# Altium PCB SensWear-V1R1-MainBoard.PcbDoc (part 2 of 3)
Units mm, origin at the board's own origin, x right, y up, seen from the top; angles counter-clockwise.
Board outline 52.5 x 8.5 mm, 4 copper layers (Top Layer, Layer 1, Layer 2, Bottom Layer), stack 0.148 mm thick; 77 components, 63 nets, 291 pads, 132 vias.
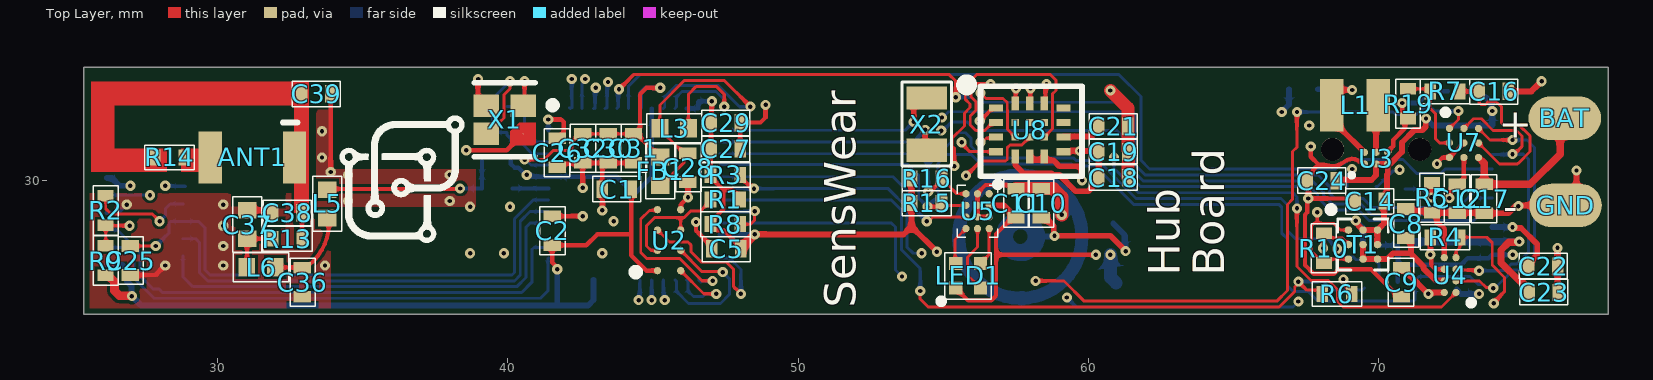
[diagram p0: Top Layer view]

## Part data (continued)
R2 R15 R16: library part ERJ-2RKF1501X, "RES SMD 1.5K OHM 1% 1/10W 0402", Manufacturer="Panasonic Electronic Components", Operating Temperature="-55°C ~ 155°C", Package / Case="0402 (1005 Metric)", Power (Watts)="0.1W, 1/10W", Resistance (Ohms)=1.5k, Supplier Device Package=0402, Supplier Part Number 1=P1.50KLDKR-ND, Temperature Coefficient=±100ppm/°C, Tolerance=±1%, Category=Resistors, ComponentLink1Description=https://industrial.panasonic.com/cdbs/www-data/pdf/RDA0000/AOA0000C283.pdf, ComponentLink1URL=https://industrial.panasonic.com/cdbs/www-data/pdf/RDA0000/AOA0000C283.pdf, Composition="Thick Film", Failure Rate=-, Features="Automotive AEC-Q200", Height - Seated (Max)="0.016\" (0.40mm)", Manufacturer Part Number=ERJ-2RKF1501X, Number of Terminations=2, Packaging=Digi-Reel®, Part Status=Active, Pricing 1="1=0.1, 10=0.025, 25=0.018, 50=0.0136, 100=0.01, 250=0.00764, 500=0.00612, 1000=0.00451, 5000=0.00323 (USD)", RoHS="RoHS Compliant", Size / Dimension="0.039\" L x 0.020\" W (1.00mm x 0.50mm)", Stock 1=1349197, Supplier 1=Digi-Key
R4: library part ERJ-2RKF1003X, "RES SMD 100K OHM 1% 1/10W 0402", Manufacturer="Panasonic Electronic Components", Operating Temperature="-55°C ~ 155°C", Package / Case="0402 (1005 Metric)", Power (Watts)="0.1W, 1/10W", Resistance (Ohms)=100k, Supplier Device Package=0402, Supplier Part Number 1=P100KLDKR-ND, Temperature Coefficient=±100ppm/°C, Tolerance=±1%, Category=Resistors, ComponentLink1Description=https://industrial.panasonic.com/cdbs/www-data/pdf/RDA0000/AOA0000C283.pdf, ComponentLink1URL=https://industrial.panasonic.com/cdbs/www-data/pdf/RDA0000/AOA0000C283.pdf, Composition="Thick Film", Failure Rate=-, Features="Automotive AEC-Q200", Height - Seated (Max)="0.016\" (0.40mm)", Manufacturer Part Number=ERJ-2RKF1003X, Number of Terminations=2, Packaging=Digi-Reel®, Part Status=Active, Pricing 1="1=0.1, 10=0.025, 25=0.018, 50=0.0136, 100=0.01, 250=0.00764, 500=0.00612, 1000=0.00451, 5000=0.00323 (USD)", RoHS="RoHS Compliant", Size / Dimension="0.039\" L x 0.020\" W (1.00mm x 0.50mm)", Stock 1=5976308, Supplier 1=Digi-Key
R5: library part ERJ2RKF2202X, "Res Thick Film 0402 22K Ohm 1% 0.1W(1/10W) ±100ppm/C Pad SMD Automotive T/R", Case Code (Imperial)=0402, Case Code (Metric)=1005, Manufacturer=Panasonic, Manufacturer Lifecycle Status=ACTIVE, Max Operating Temperature=155°C, Max Power Dissipation=100mW, Min Operating Temperature=-55°C, Ratings=AEC-Q200, Temperature Coefficient=100ppm/°C, Tolerance=1%, Voltage Rating=50V, Case/Package=0402, Category="Chip SMD Resistors", China RoHS=Non-Compliant, ComponentLink1Description=https://sigma.octopart.com:443/138766958/technical_drawing/Panasonic-ERJ-2RKF2202X.pdf?src-supplier=Upverter, ComponentLink1URL=https://sigma.octopart.com:443/138766958/technical_drawing/Panasonic-ERJ-2RKF2202X.pdf?src-supplier=Upverter, ComponentLink2Description=https://datasheet.octopart.com:443/ERJ2RKF2202X-Panasonic-datasheet-82288794.pdf?src-supplier=Upverter, ComponentLink2URL=https://datasheet.octopart.com:443/ERJ2RKF2202X-Panasonic-datasheet-82288794.pdf?src-supplier=Upverter, ComponentLink3Description=https://datasheet.octopart.com:443/ERJ2RKF2202X-Panasonic-datasheet-13266541.pdf?src-supplier=RS+(Formerly+Allied+Electronics), ComponentLink3URL=https://datasheet.octopart.com:443/ERJ2RKF2202X-Panasonic-datasheet-13266541.pdf?src-supplier=RS+(Formerly+Allied+Electronics), ComponentLink4Description=https://datasheet.octopart.com:443/ERJ2RKF2202X-Panasonic-datasheet-10025800.pdf?src-supplier=Future+Electronics, ComponentLink4URL=https://datasheet.octopart.com:443/ERJ2RKF2202X-Panasonic-datasheet-10025800.pdf?src-supplier=Future+Electronics, ComponentLink5Description=https://datasheet.octopart.com:443/ERJ2RKF2202X-Panasonic-datasheet-8853621.pdf?src-supplier=Future+Electronics, ComponentLink5URL=https://datasheet.octopart.com:443/ERJ2RKF2202X-Panasonic-datasheet-8853621.pdf?src-supplier=Future+Electronics, ComponentLink6Description=https://datasheet.octopart.com:443/ERJ2RKF2202X-Panasonic-datasheet-5313456.pdf?src-supplier=Future+Electronics, ComponentLink6URL=https://datasheet.octopart.com:443/ERJ2RKF2202X-Panasonic-datasheet-5313456.pdf?src-supplier=Future+Electronics, ComponentLink7Description=https://datasheet.octopart.com:443/ERJ2RKF2202X-Panasonic-datasheet-48891056.pdf?src-supplier=Newark, ComponentLink7URL=https://datasheet.octopart.com:443/ERJ2RKF2202X-Panasonic-datasheet-48891056.pdf?src-supplier=Newark, ComponentLink8Description=https://datasheet.octopart.com:443/ERJ2RKF2202X-Panasonic-datasheet-136608610.pdf?src-supplier=Newark, ComponentLink8URL=https://datasheet.octopart.com:443/ERJ2RKF2202X-Panasonic-datasheet-136608610.pdf?src-supplier=Newark, ComponentLink9Description=https://datasheet.octopart.com:443/ERJ-2RKF2202X-Panasonic-datasheet-154766169.pdf?src-supplier=Master+Electronics, ComponentLink9URL=https://datasheet.octopart.com:443/ERJ-2RKF2202X-Panasonic-datasheet-154766169.pdf?src-supplier=Master+Electronics, ComponentLink10Description=https://datasheet.octopart.com:443/ERJ2RKF2202X-Panasonic-datasheet-188592431.pdf?src-supplier=TME, ComponentLink10URL=https://datasheet.octopart.com:443/ERJ2RKF2202X-Panasonic-datasheet-188592431.pdf?src-supplier=TME, ComponentLink11Description=https://datasheet.octopart.com:443/ERJ2RKF2202X-Panasonic-datasheet-164353789.pdf?src-supplier=TME, ComponentLink11URL=https://datasheet.octopart.com:443/ERJ2RKF2202X-Panasonic-datasheet-164353789.pdf?src-supplier=TME, ComponentLink12Description=https://datasheet.octopart.com/ERJ2RKF2202X-Panasonic-datasheet-78375410.pdf, ComponentLink12URL=https://datasheet.octopart.com/ERJ2RKF2202X-Panasonic-datasheet-78375410.pdf, ComponentLink13Description=https://datasheet.octopart.com/Precision-Thick-Film-Chip-Resistors-Panasonic-datasheet-family-106.pdf, ComponentLink13URL=https://datasheet.octopart.com/Precision-Thick-Film-Chip-Resistors-Panasonic-datasheet-family-106.pdf, ComponentLink14Description=https://datasheet.octopart.com:443/ERJ2RKF2202X-Panasonic---ECG-datasheet-15994758.pdf?src-supplier=Farnell, ComponentLink14URL=https://datasheet.octopart.com:443/ERJ2RKF2202X-Panasonic---ECG-datasheet-15994758.pdf?src-supplier=Farnell, ComponentLink15Description=https://datasheet.octopart.com:443/ERJ2RKF2202X-Panasonic-datasheet-11542829.pdf?src-supplier=Arrow+Electronics, ComponentLink15URL=https://datasheet.octopart.com:443/ERJ2RKF2202X-Panasonic-datasheet-11542829.pdf?src-supplier=Arrow+Electronics, ComponentLink16Description=https://datasheet.octopart.com:443/ERJ-2RKF2202X-Panasonic-datasheet-41391857.pdf?src-supplier=Electro+Sonic, ComponentLink16URL=https://datasheet.octopart.com:443/ERJ-2RKF2202X-Panasonic-datasheet-41391857.pdf?src-supplier=Electro+Sonic, Composition="Thick Film", Contact Plating=Tin, Country of Origin="Japan, Mainland China", Depth=500µm, Export Control Classification Number (ECCN) Code=EAR99, Harmonized Tariff Schedule (HTS) Code=8533.21.00.30, Height=350µm, Introduction Date=2002-02-12, Lead Free="Lead Free", Length=1mm, Lifecycle Status=Production, Manufacturer Part Number=ERJ2RKF2202X, Military Standard=Not, Mounting Technology="Surface Mount", Number of Terminals=2, Number of Terminations=2, Packaging="Cut Tape", Part Series="Precision Thick Film Chip Resistors", Pins=2, Power Rating=100mW, Pricing="10000=0.0071, 30000=0.0069, 100000=0.0067, 200000=0.0066, 400000=0.0064 (USD)", Radiation Hardening=No, REACH SVHC=Yes, RoHS=Compliant, Schedule B="8533210045, 8533210045|8533210045, 8533210045|8533210045|8533210045, 8533210045|8533210045|8533210045|8533210045", Stock=20000, Supplier="Future Electronics", Supplier Part Number=ERJ2RKF2202X, Termination=SMD/SMT, Voltage Rating (DC)=50V, Width=500µm, Working Voltage=50V
R13 R14: library part ERJ-2GE0R00X, "RES SMD 0.0OHM JUMPER 1/10W 0402", Manufacturer="Panasonic Electronic Components", Operating Temperature="-55°C ~ 155°C", Package / Case="0402 (1005 Metric)", Power (Watts)="0.1W, 1/10W", Resistance (Ohms)=0.0, Supplier Device Package=0402, Supplier Part Number 1=P0.0JDKR-ND, Temperature Coefficient=-, Tolerance=Jumper, Category=Resistors, ComponentLink1Description=http://industrial.panasonic.com/www-cgi/jvcr13pz.cgi?E+PZ+3+AOA0001+ERJ2GE0R00X+7+WW, ComponentLink1URL=http://industrial.panasonic.com/www-cgi/jvcr13pz.cgi?E+PZ+3+AOA0001+ERJ2GE0R00X+7+WW, Composition="Thick Film", Features="Automotive AEC-Q200", Height="0.016\" (0.40mm)", Manufacturer Part Number=ERJ-2GE0R00X, Number of Terminations=2, Packaging=Digi-Reel®, Part Status=Active, Pricing 1="1=0.07, 50=0.0104, 100=0.0078, 250=0.00584, 500=0.0043, 1000=0.00287, 5000=0.00202 (GBP)", RoHS="RoHS Compliant", Size / Dimension="0.039\" L x 0.020\" W (1.00mm x 0.50mm)", Stock 1=6022701, Supplier 1=Digi-Key
R19: library part ERJ-2RKF1002X, "RES SMD 10K OHM 1% 1/10W 0402", Manufacturer="Panasonic Electronic Components", Operating Temperature="-55°C ~ 155°C", Package / Case="0402 (1005 Metric)", Power (Watts)="0.1W, 1/10W", Resistance (Ohms)=10k, Supplier Device Package=0402, Supplier Part Number 1=P10.0KLDKR-ND, Temperature Coefficient=±100ppm/°C, Tolerance=±1%, Category=Resistors, ComponentLink1Description=https://industrial.panasonic.com/cdbs/www-data/pdf/RDA0000/AOA0000C283.pdf, ComponentLink1URL=https://industrial.panasonic.com/cdbs/www-data/pdf/RDA0000/AOA0000C283.pdf, Composition="Thick Film", Failure Rate=-, Features="Automotive AEC-Q200", Height - Seated (Max)="0.016\" (0.40mm)", Manufacturer Part Number=ERJ-2RKF1002X, Number of Terminations=2, Packaging=Digi-Reel®, Part Status=Active, Pricing 1="1=0.1, 10=0.025, 25=0.018, 50=0.0136, 100=0.01, 250=0.00764, 500=0.00612, 1000=0.00451, 5000=0.00323 (USD)", RoHS="RoHS Compliant", Size / Dimension="0.039\" L x 0.020\" W (1.00mm x 0.50mm)", Stock 1=8105773, Supplier 1=Digi-Key
SW1: "Slide Switch, SPDT, Latched, 0.01A, 5VDC, Solder Terminal, Surface Mount-right Angle", Case/Package=SMD/SMT, Contact Current Rating=10mA, Contact Resistance=500mΩ, Insulation Resistance=100MΩ, Manufacturer=ALPS, Max Operating Temperature=60°C, Max Voltage Rating (DC)=5V, Min Operating Temperature=-10°C, Operating Force=1.5N, Supplier Part Number=4809-SSAJ110100DKR-ND, Actuator Length=1.2954mm, Category=Switches, ComponentLink1Description=https://datasheet.octopart.com:443/SSAJ110100-ALPS-datasheet-182235015.pdf?src-supplier=IHS, ComponentLink1URL=https://datasheet.octopart.com:443/SSAJ110100-ALPS-datasheet-182235015.pdf?src-supplier=IHS, ComponentLink2Description=https://datasheet.octopart.com:443/SSAJ110100-ALPS-datasheet-182235575.pdf?src-supplier=IHS, ComponentLink2URL=https://datasheet.octopart.com:443/SSAJ110100-ALPS-datasheet-182235575.pdf?src-supplier=IHS, ComponentLink3Description=https://datasheet.octopart.com:443/SSAJ110100-ALPS-datasheet-140497758.pdf?src-supplier=TME, ComponentLink3URL=https://datasheet.octopart.com:443/SSAJ110100-ALPS-datasheet-140497758.pdf?src-supplier=TME, Electrical Life=10kcycles, Export Control Classification Number (ECCN) Code=EAR99, Harmonized Tariff Schedule (HTS) Code=8536.50.70.00, Height=700µm, Illumination Type=Non-Illuminated, Introduction Date=2013-10-09, Length=5.5mm, Lifecycle Status=Production, Manufacturer Part Number=SSAJ110100, Max Current Rating=10mA, Mechanical Life=100kcycles, Mounting Technology="Surface Mount", Number of Positions=2, Packaging="Tape and Reel", Pricing="1=1.91, 10=1.613, 25=1.4968, 100=1.3334, 250=1.23648, 500=1.17008, 1000=1.10989, 2500=1.071 (USD)", Radiation Hardening=No, RoHS=Compliant, Stock=6215, Supplier=DigiKey, Supplier 1=DigiKey, Supplier Part Number 1=4809-SSAJ110100DKR-ND, Termination=Solder, Throw Configuration=SPDT, Voltage Rating (DC)=5V
T1: "MOSFET 2P-CH 3.9A 9DSBGA", Current - Continuous Drain (Id) @ 25°C=3.9A, Drain to Source Voltage (Vdss)=-, Input Capacitance (Ciss) (Max) @ Vds="595pF @ 10V", Manufacturer="Texas Instruments", Operating Temperature="-55°C ~ 150°C (TJ)", Package / Case="9-UFBGA, DSBGA", Power - Max=700mW, Supplier Device Package=9-DSBGA, .CheckedFootprint=Yes, .CheckedSchematic=Yes, Category="Discrete Semiconductor Products", ComponentLink1Description=http://www.ti.com/lit/ds/symlink/csd75207w15.pdf, ComponentLink1URL=http://www.ti.com/lit/ds/symlink/csd75207w15.pdf, FET Feature="Logic Level Gate", FET Type="2 P-Channel (Dual)", Gate Charge (Qg) (Max) @ Vgs="3.7nC @ 4.5V", Manufacturer Part Number=CSD75207W15, Mounting Type="Surface Mount", Packaging=Digi-Reel®, Part Status=Active, Pricing="1=0.83, 10=0.73, 100=0.5629, 500=0.41694, 1000=0.33356 (USD)", Rds On (Max) @ Id, Vgs="162 mOhm @ 1A, 1.8V", RoHS="RoHS Compliant", Stock=10783, Supplier 1="Arrow Electronics", Supplier Part Number 1=CSD75207W15, Vgs(th) (Max) @ Id="1.1V @ 250µA"
U1: library part NRF54L15-QFAA-R, "nRF54L15 SoC with Arm Cortex-M33 processor", Manufacturer="Nordic Semiconductor", Supplier Part Number=949-NRF54L15-QFAA-R, Category="RF Receivers, Transceivers", Manufacturer Part Number=NRF54L15-QFAA-R, Pricing="1=6.84, 10=6.11, 50=6.11, 100=5.02, 1000=3.62, 10000=3.07 (USD)", RoHS=No, Stock=719, Supplier=Mouser
U2: "M95P32-I Series 32 Mb (4 M x 8) 80 MHz SPI EEPROM Memory IC - WLCSP-8", Manufacturer=STMicroelectronics, Supplier Part Number=497-M95P32-IXCST/EFDKR-ND, Supplier Part Number 1=511-M95P32-IXCST/EF, Category=Memory, Manufacturer Part Number=M95P32-IXCST/EF, Pricing="1=2.68, 10=2.409, 25=2.2724, 100=1.9362, 250=1.818, 500=1.59076, 1000=1.31805, 2500=1.22715 (USD)", RoHS=No, Stock=9222, Supplier=Digikey, Supplier 1=Mouser, Supplier 2=Digikey, Supplier Part Number 2=497-M95P32-IXCST/EFCT-ND
U3: "Conv DC-DC 1.8V to 6.5V Synchronous Step Down Single-Out 1.8V to 3.3V 0.75A 6-Pin DSBGA T/R", Manufacturer="Texas Instruments", Supplier Part Number=595-TPS62840YBGR, Category="Voltage Regulators - Switching", Manufacturer Part Number=TPS62840YBGR, Pricing="1=1,97, 10=1,77, 50=1,77, 100=1,42, 1000=0,972, 10000=0,865 (USD)", RoHS=Yes, Stock=2271, Supplier=Mouser, Supplier 1=Mouser, Supplier Part Number 1=595-TPS62840YBGR
U4: "1-A Li-ion I²C programmable charger with regulated power path in WCSP package 8-DSBGA -40 to 85", Manufacturer="Texas Instruments", Supplier Part Number=296-BQ25180YBGRCT-ND, Supplier Part Number 1=595-BQ25180YBGR, Category="Integrated Circuits (ICs)", Manufacturer Part Number=BQ25180YBGR, Pricing="1=2,65, 10=2,382, 25=2,2472, 100=1,9147, 250=1,7978, 500=1,57308, 1000=1,3034 (USD)", RoHS=No, Stock=2812, Supplier=Digi-Key, Supplier 1=Mouser
U5: library part LP5562TME/NOPB, "IC LED DRIVER LINEAR DIM 25.5MA", Current - Output / Channel=25.5mA, Frequency="256kHz, 558kHz", Manufacturer="Texas Instruments", Operating Temperature="-40°C ~ 85°C (TA)", Package / Case="12-WFBGA, DSBGA", Supplier Device Package=12-DSBGA, Supplier Part Number 1=296-39060-6-ND, Voltage - Output=-, Voltage - Supply (Max)=5.5V, Voltage - Supply (Min)=2.7V, Applications=Backlight, Category="Integrated Circuits (ICs)", ComponentLink1Description=http://www.ti.com/lit/ds/symlink/lp5562.pdf, ComponentLink1URL=http://www.ti.com/lit/ds/symlink/lp5562.pdf, Dimming=I²C, Internal Switch(s)=Yes, Manufacturer Part Number=LP5562TME/NOPB, Mounting Type="Surface Mount", Number of Outputs=4, Packaging=Digi-Reel®, Part Status=Active, Pricing 1="1=1.34, 10=1.195, 100=0.9314 (USD)", RoHS="RoHS Compliant", Stock 1=4154, Supplier 1=Digi-Key, Topology=-, Type=Linear
U6: "1.5A output current, buck-boost MicroSiP™ power module with integrated inductor with I²C 8-uSiP -40 to 125", Manufacturer="Texas Instruments", Manufacturer Lifecycle Status=ACTIVE, Supplier Part Number=595-TPSM831021SIUR, Category="Voltage Regulators - Switching", ComponentLink1Description=https://octopart.com:443/opatz8j6/c1?t=1vxQQwx7TOAj9FA5SAjYf-PM2GMohsbgC04BrqIyIUoGmA7zdRLwbkPi0-I8FrksUgPxUwbGCYWtwThYV-KnzQfz1oTrUxzeL5cOfaQnthmRq6ADpCLaHp5JrIbb6cgfJIMgeLAStVpvqMRJWc6Yal_MwBsyemKGdD71ihduhM8mRGYBabo_yu3Qx5wXw-xz84pVCfLzcr0zIMJbnrhY9ixfkLjguXZyMK1DFLb7NzaBV3N62BonJqonzahOnLJWkG214iKtXDOwsTkVLMpxpvY7ilA5fe2cf7_u5R_sEAjjMbnvkWUs-qzHlIvYXhlQIX-e4wdexaSxNG4YUph8zgYx4izLfMmtyaps11Lo0lWlOmAtv_UcgO7e3icqZp1421nsrlt2N-g&src-supplier=Texas+Instruments, ComponentLink1URL=https://octopart.com:443/opatz8j6/c1?t=1vxQQwx7TOAj9FA5SAjYf-PM2GMohsbgC04BrqIyIUoGmA7zdRLwbkPi0-I8FrksUgPxUwbGCYWtwThYV-KnzQfz1oTrUxzeL5cOfaQnthmRq6ADpCLaHp5JrIbb6cgfJIMgeLAStVpvqMRJWc6Yal_MwBsyemKGdD71ihduhM8mRGYBabo_yu3Qx5wXw-xz84pVCfLzcr0zIMJbnrhY9ixfkLjguXZyMK1DFLb7NzaBV3N62BonJqonzahOnLJWkG214iKtXDOwsTkVLMpxpvY7ilA5fe2cf7_u5R_sEAjjMbnvkWUs-qzHlIvYXhlQIX-e4wdexaSxNG4YUph8zgYx4izLfMmtyaps11Lo0lWlOmAtv_UcgO7e3icqZp1421nsrlt2N-g&src-supplier=Texas+Instruments, ComponentLink2Description=http://sigma.octopart.com:80/reach_statement/Texas-Instruments-company-64.pdf?src-supplier=Compliance+Statements, ComponentLink2URL=http://sigma.octopart.com:80/reach_statement/Texas-Instruments-company-64.pdf?src-supplier=Compliance+Statements, ComponentLink3Description=http://sigma.octopart.com:80/conflict_mineral_statement/Texas-Instruments-company-63.pdf?src-supplier=Compliance+Statements, ComponentLink3URL=http://sigma.octopart.com:80/conflict_mineral_statement/Texas-Instruments-company-63.pdf?src-supplier=Compliance+Statements, Length=2.6mm, Lifecycle Status=Production, Manufacturer Part Number=TPSM831021SIUR, Pins=8, Pricing="1=7.7, 10=6.91, 50=6.91, 100=5.66, 1000=4.06, 10000=3.86 (USD)", RoHS=Compliant, Stock=2610, Supplier=Mouser, Supplier 1=Mouser, Supplier Part Number 1=595-TPSM831021SIUR, Thickness=1.15mm, Topology=Buck-Boost, Width=2mm
U7: "Single-cell battery fuel gauge with pre-programmed chemistry and integrated sense resistor 9-DSBGA -40 to 85", Manufacturer="Texas Instruments", Supplier Part Number=595-BQ27427YZFR, Manufacturer Part Number=BQ27427YZFR, Pricing="1=2,56, 10=2,31, 50=2,18, 100=1,86, 1000=1,26, 10000=1,15 (USD)", RoHS=No, Stock=1221, Supplier=Mouser, Supplier 1=Mouser, Supplier Part Number 1=595-BQ27427YZFR
U8: "Programmable smart sensor combining accelerometer, gyroscope and fusion software", Manufacturer="Bosch Tools", Supplier Part Number=828-BHI360DKR-ND, Category=Uncategorized, Checked=TRUE, Manufacturer Part Number=BHI360, Pricing="1=6.54, 10=5.232, 25=4.8396, 100=4.1854, 500=3.92384, 1000=3.66226 (USD)", RoHS=No, Stock=17060, Supplier=Digikey, Supplier 1=Digikey, Supplier 2=Mouser, Supplier Part Number 1=828-BHI360DKR-ND, Supplier Part Number 2=262-BHI360
X1: library part ABM11W-32.0000MHZ-8-B1U-T3, "CRYSTAL 32.0000MHZ 8PF SMD, 2x1.6mm, RoHS", Manufacturer=Abracon, Supplier Part Number=535-13899-1-ND, Supplier Part Number 1=815-11W32-8B1UT, Category=Crystals, Checked=TRUE, ComponentLink1Description=https://abracon.com/Resonators/ABM11W.pdf?src-supplier=Digikey, ComponentLink1URL=https://abracon.com/Resonators/ABM11W.pdf?src-supplier=Digikey, ComponentLink2Description=https://datasheet.octopart.com/ABM11W-32.0000MHZ-8-B1U-T3-Abracon-datasheet-112015802.pdf?src-supplier=Master+Electronics, ComponentLink2URL=https://datasheet.octopart.com/ABM11W-32.0000MHZ-8-B1U-T3-Abracon-datasheet-112015802.pdf?src-supplier=Master+Electronics, Frequency="32 MHz", Manufacturer Part Number=ABM11W-32.0000MHZ-8-B1U-T3, Pricing="1=0.82, 10=0.709, 50=0.6394, 100=0.6115, 500=0.5517, 1000=0.52788 (USD)", RoHS=Yes, Stock=52771, Supplier=Digikey, Supplier 1=Mouser, Supplier 2=Digikey, Supplier 3=Digikey, Supplier 4=Digikey, Supplier Part Number 2=535-13899-1-ND, Supplier Part Number 3=535-13899-6-ND, Supplier Part Number 4=535-13899-2-ND
X2: library part ABS06-32.768KHZ-1-T, "CRYSTAL 32.768 KHZ 12.5 PF SMD", ESR (Equivalent Series Resistance)="90 kOhm", Frequency Stability=-, Frequency Tolerance=±10ppm, Load Capacitance=12.5pF, Manufacturer="Abracon Corporation", Operating Mode=Fundamental, Operating Temperature="-40°C ~ 85°C", Package / Case=2-SMD, Supplier Part Number 1=535-10248-6-ND, Category="Crystals and Oscillators", ComponentLink1Description=http://www.abracon.com/Resonators/ABS06.pdf, ComponentLink1URL=http://www.abracon.com/Resonators/ABS06.pdf, Frequency=32.768kHz, Height="0.024\" (0.60mm)", Manufacturer Part Number=ABS06-32.768KHZ-1-T, Mounting Type="Surface Mount", Packaging=Digi-Reel®, Pricing 1="1=2.25, 10=1.952, 50=1.711, 100=1.3508, 500=1.14066, 750=0.99659, 1000=0.90053 (EUR)", Ratings=-, RoHS="RoHS Compliant", Size / Dimension="0.079\" L x 0.047\" W (2.00mm x 1.20mm)", Stock 1=6467, Supplier 1=Digi-Key, Type="kHz Crystal (Tuning Fork)"

## Via types
v1: diameter 0.35, hole 0.15, Top Layer to Bottom Layer, tented top, 75 vias
v2: diameter 0.35, hole 0.15, Top Layer to Bottom Layer, tented both sides, 57 vias

## Nets (pads, with @x,y where several pads share a name; then routed paths per layer and width w, separated by ;. In a path a pad name is that pad's centre, name@x,y a point inside that pad or via, vN(x,y) a via of type N, cw(c..) or ccw(c..) an arc to the next point about the centre after c; other vN are vias at no path point)
1V8: C1.1 C2.1 C5.2 C6.1 C18.2 C19.2 C22.2 C26.1 C27.1 C29.1 L1.2 P2.1 P3.8 R1.2 R3.1 R6.1 R8.1 R9.1 R15.1 R16.1 U1.10 U1.22 U1.36 U1.47 U1.48 U2.A2 U3.A2 U8.5 U8.8 | length 109.9
  Top Layer w0.1: v1(68.775,26.6) 68.82,26.555 68.82,26.386 68.879,26.327 68.91,26.327 69.06,26.177 R6.1@69.06,26.102
  Top Layer w0.15: v2(41.392,32.109) 41.839,32.109 41.927,32.021 41.927,31.586 41.802,31.461 C26.1@41.702,31.461 ; v2(41.702,26.951) 41.702,27.005 41.527,27.18 C2.1@41.527,27.776 42.701,27.776 43.075,28.15 44.25,28.15 ; C2.1@41.727,27.676 C2.1@41.752,27.701 ; C1.1@44.252,29.751 C1.1@44.252,29.701 44.252,28.776 44.252,27.426 44.777,26.901 U2.A2@45.152,26.901 ; R3.1@46.978,30.2 46.978,31.101 47.002,31.124 C29.1@47.002,32.001 47.013,32.013 47.013,32.724 v2(47.025,32.736) ; R3.1@46.98,30.2 46.98,30.125 47.425,29.68 ; C5.2@47.925,27.8 47.925,27.85 47.9,27.875 47.85,27.875 47.425,28.3 47.105,28.3 46.98,28.425 R8.1@46.98,28.5 46.98,28.575 47.425,29.02 47.425,29.68 ; R1.2@48,29.35 48,29.425 47.875,29.55 47.841,29.55 47.716,29.675 47.43,29.675 47.425,29.68
  Top Layer w0.2: v2(48.5,28.15) 53.625,28.15 53.9,28.425 ; R16.1@53.9,30.1 53.9,28.425 ; v1(54.775,27.55) 53.9,28.425 ; U8.5@57.475,30.837 57.475,30.542 57.767,30.25 58.725,30.25 58.775,30.2 58.987,30.2 59.551,29.636 59.986,29.636 60.35,30 C18.2@60.35,30.1 60.35,30.975 C19.2@60.339,30.986 ; U8.8@59.138,31.025 v2(59.7,31.025) 59.95,31.025 60.325,31.025 C19.2@60.35,31 ; L1.2@68.325,33.2 68.4,33.125 v1(69.075,33.125) ; L1.2@68.375,32.6 68.375,32.1 68.675,31.8 U3.A2@69.49,30.985 ; v1(74.6,28.4) 74.629,28.371 74.89,28.371 75.45,27.811 75.45,27.45 75.15,27.15 C22.2@75.15,27.05
  Top Layer w0.3: R9.1@26.15,26.74 26.2,26.69 26.275,26.69 26.45,26.515 26.45,26.21 26.626,26.035 27.04,26.035 v2(27.05,26.025) ; C5.2@48.025,27.65 C5.2@48.075,27.6 ; C5.2@48.15,27.8 v2(48.5,28.15)
  Layer 2 w0.1: v1@68.925,26.6 73.29,26.6 73.444,26.446 73.622,26.446 74.28,27.105 74.28,28.08 v1(74.6,28.4)
  Layer 2 w0.3: v2(41.392,32.109) 42.092,31.409 42.092,28.336 42.577,27.851 ; v2(41.702,26.951) 42.426,26.951 42.602,27.127 42.602,27.801 ; 42.602,27.851 42.602,27.801 ; v2(48.5,28.15) 42.95,28.15 42.602,27.801 ; v1@54.798,27.55 55.776,27.55 57.5,29.274 57.5,30.675 57.85,31.025 v2@59.686,31.025 ; v2(59.7,31.025) 60.575,31.9 v1(67.6,31.9) 67.6,32.189 67.6,32.55 67.6,32.684 68.041,33.125 v1(69.075,33.125) 74.65,33.125 75.4,32.375 75.4,28.741 75.059,28.4 v1(74.6,28.4)
  Bottom Layer w0.15: v2(41.392,32.109) 41.392,31.746 U1.36@41.402,31.736 ; 41.702,25.723 41.725,25.7 ; U1.47@46.152,32.486 U1.48@46.552,32.486 46.552,32.711 46.577,32.736 v2@46.928,32.736 ; U1.10@47.302,28.136 47.309,28.143 48.493,28.143 v2(48.5,28.15)
  Bottom Layer w0.2: P2.1@26.19,27.1 26.73,27.1 26.875,26.955 26.875,26.539 27.034,26.38 27.034,26.055 v2@27.05,26.039 ; v2(27.05,26.025) 27.375,25.7 41.725,25.7 42.764,25.7 42.952,25.888 U1.22@42.952,26.586 ; 41.702,25.723 v2(41.702,26.951) ; C6.1@67.9,33.15 v1@69.075,33.15 ; P3.8@73.9,28.4 v1(74.6,28.4)
  Bottom Layer w0.3: v2(27.05,26.025) v2@27.05,26.039
CHG_AC: AC.1 C9.1 C10.2 P1.1 P2.11 U4.A2 | length 57.5
  Top Layer w0.2: C10.2@58.35,28.775 58.45,28.775 58.796,28.429 58.796,28.129 v1(58.825,28.1) 60.75,28.1 v1(61.275,27.575) ; C9.1@70.775,27.025 70.875,27.025 70.975,26.925 70.975,26.825 v2(71.7,26.1) 71.741,26.1 71.791,26.15 U4.A2@72.25,26.15
  Layer 1 w0.15: v2(27,29.825) 26.99,29.815 26.69,29.815 26.525,29.65 26.525,26.925 26.975,26.475 27.75,26.475 27.987,26.238 45.612,26.238 46.1,25.75 58.325,25.75 58.825,26.25 v1(58.825,28.1)
  Layer 2 w0.2: v1(61.275,27.575) 67.125,27.575 68.6,26.1 v2(71.7,26.1)
  Bottom Layer w0.2: P2.11@26.19,30.1 26.2,30.09 26.36,30.09 26.625,29.825 v2(27,29.825) ; 58.15,28.075 58.2,28.075 v1@58.875,28.075 ; AC.1@60.85,28.525 61.246,28.129 61.246,27.604 v1(61.275,27.575)